# Altium PCB STM32_Dev_Board.PcbDoc (part 1 of 2)
Units mm, origin at the board's own origin, x right, y up, seen from the top; angles counter-clockwise.
Board outline 84.25 x 50.53 mm, 4 copper layers (Top Layer, Int1 (GND), Int2 (PWR), Bottom Layer), stack 1.57 mm thick; 70 components, 69 nets, 319 pads, 189 vias.
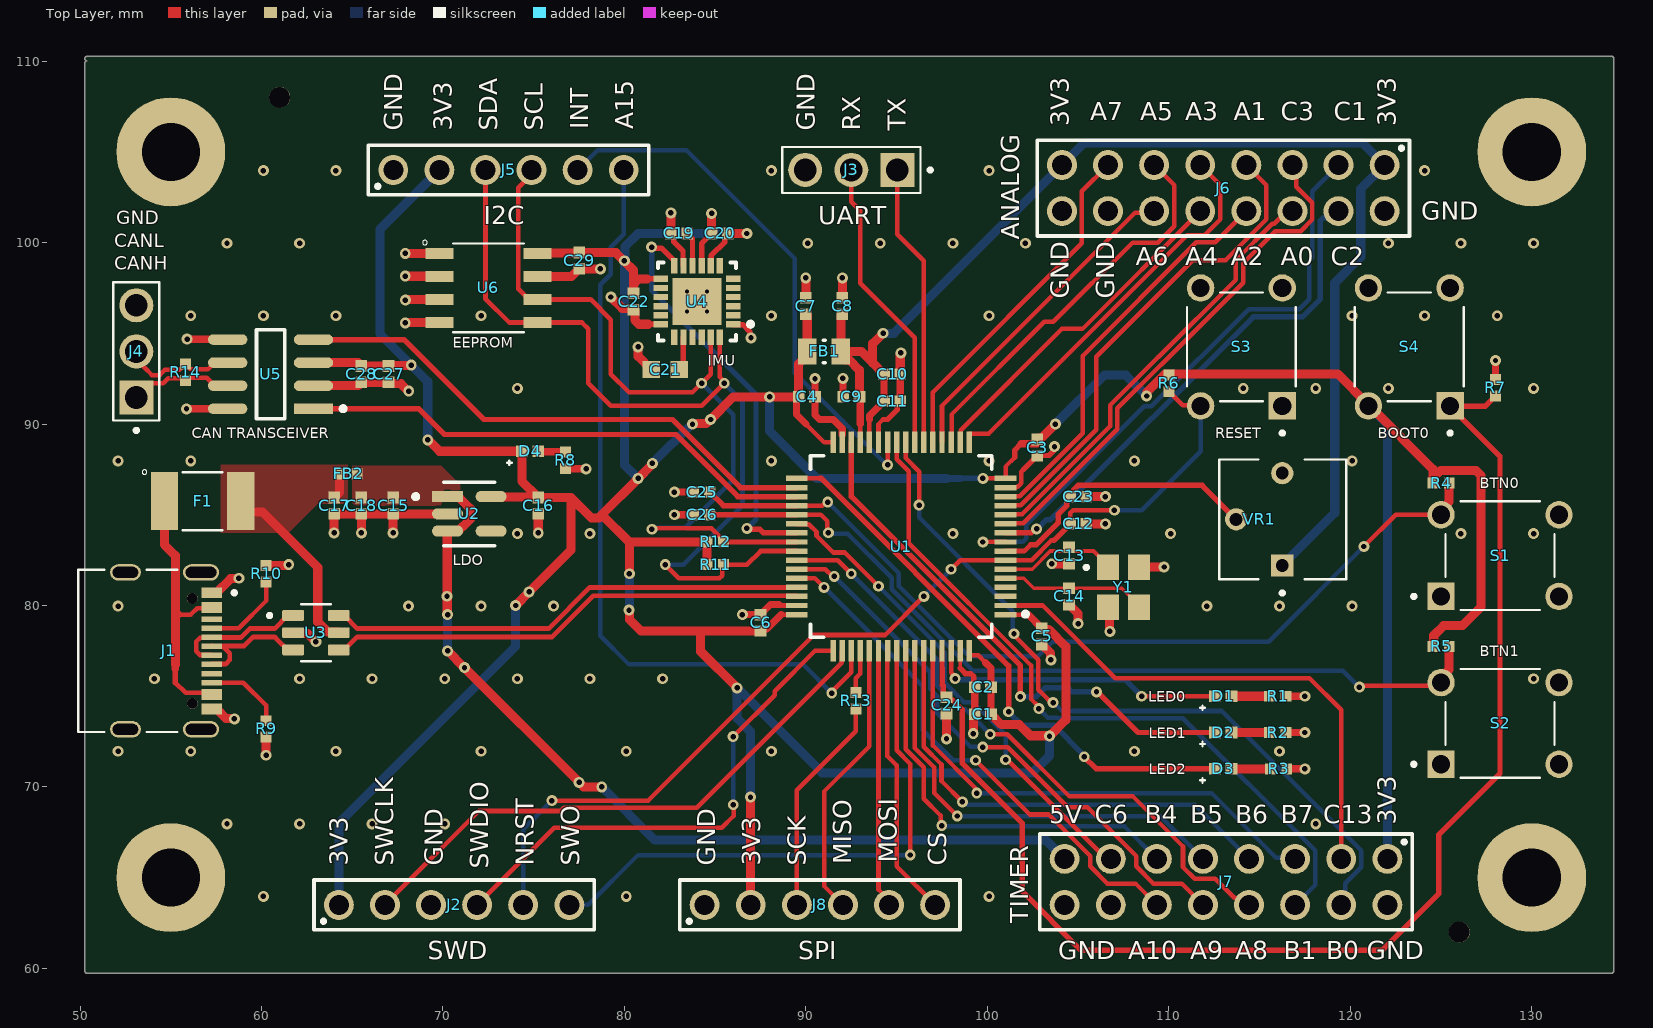
[diagram p0: Top Layer view]
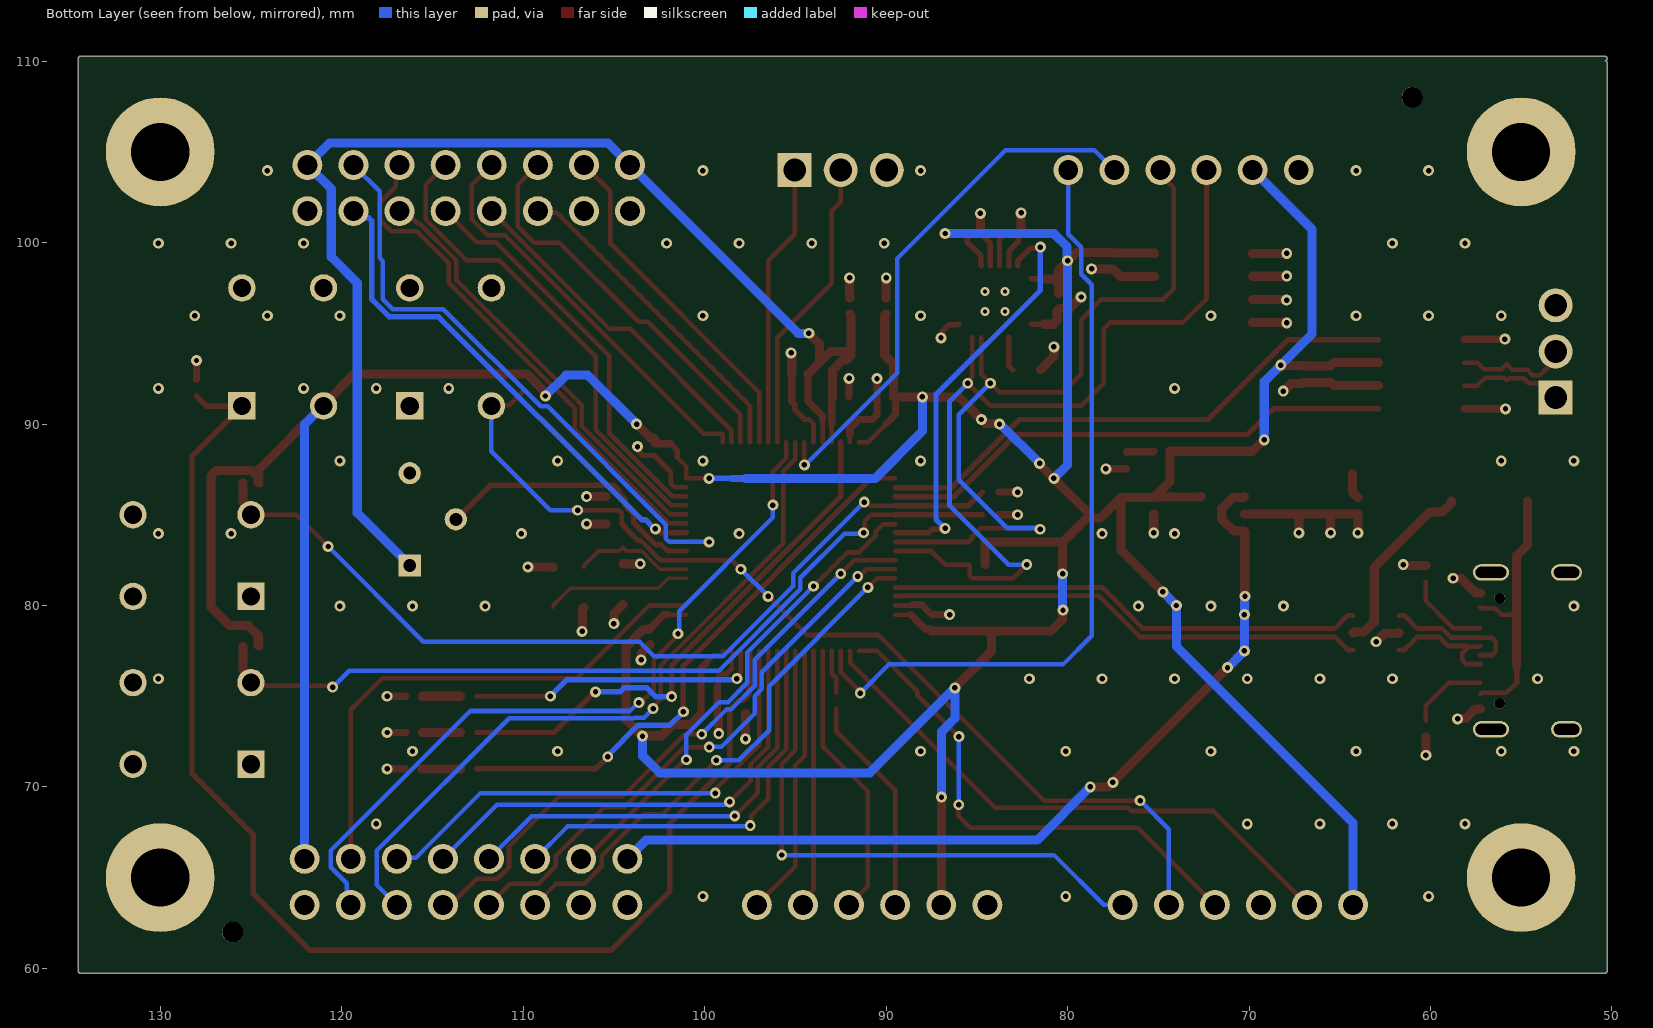
[diagram p1: Bottom Layer view, seen from below]
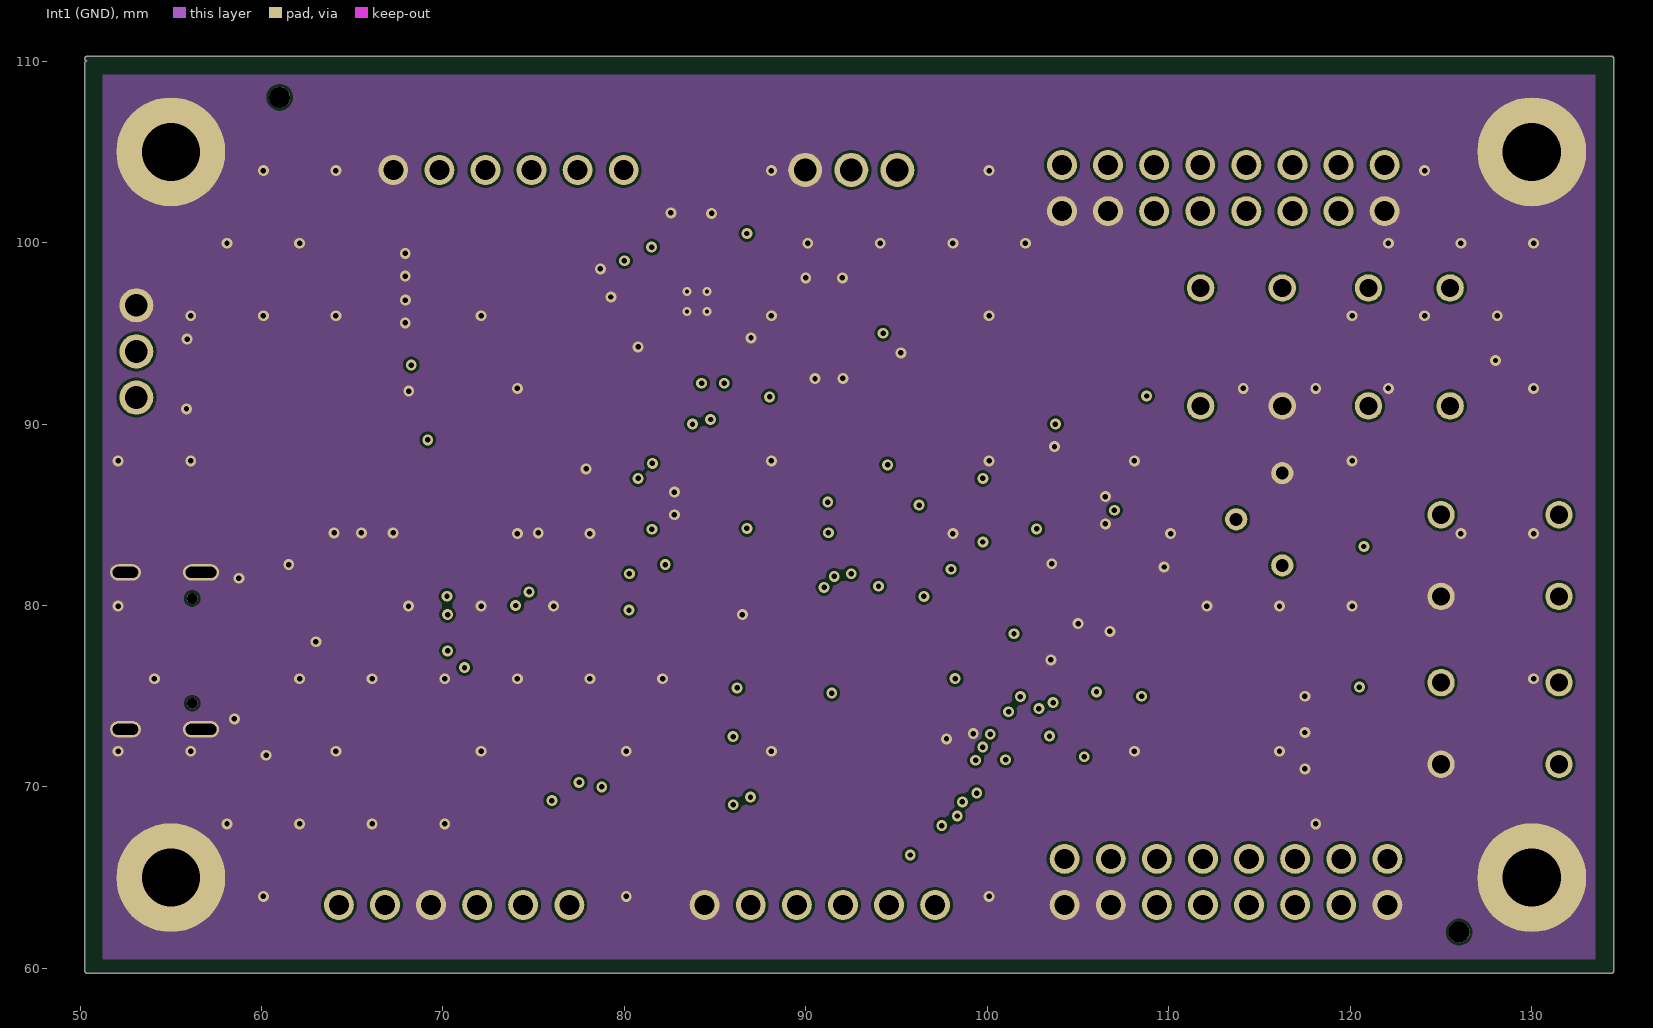
[diagram p2: Int1 (GND)]
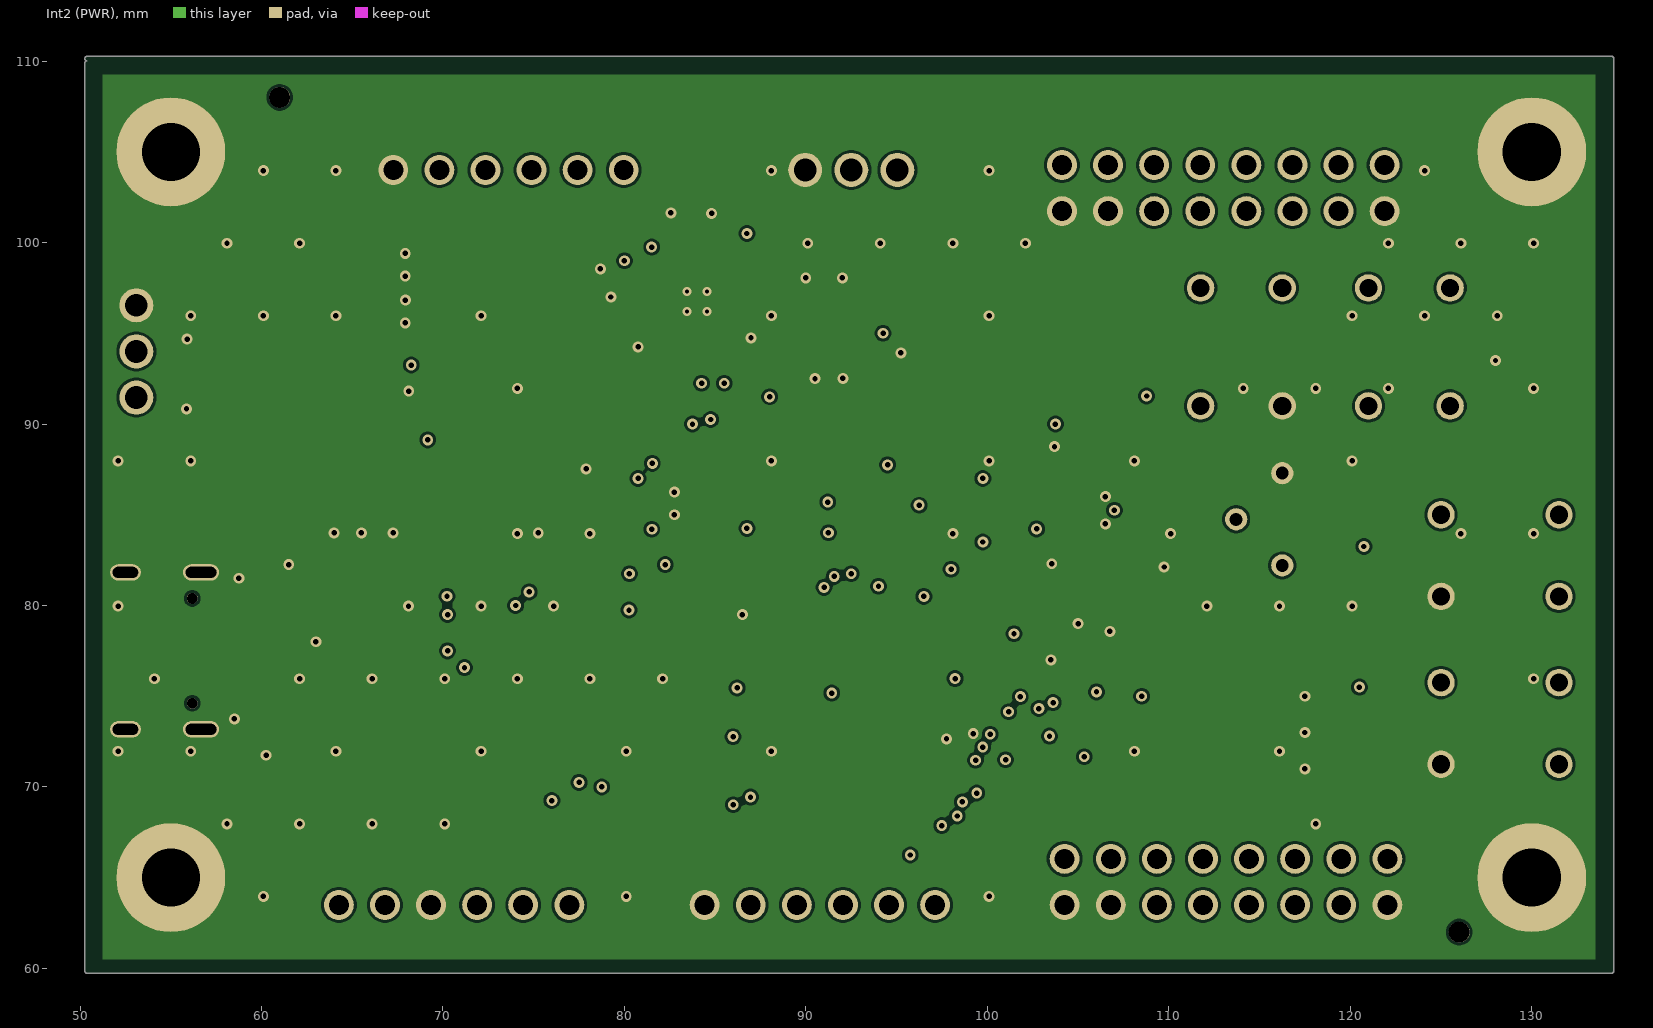
[diagram p3: Int2 (PWR)]
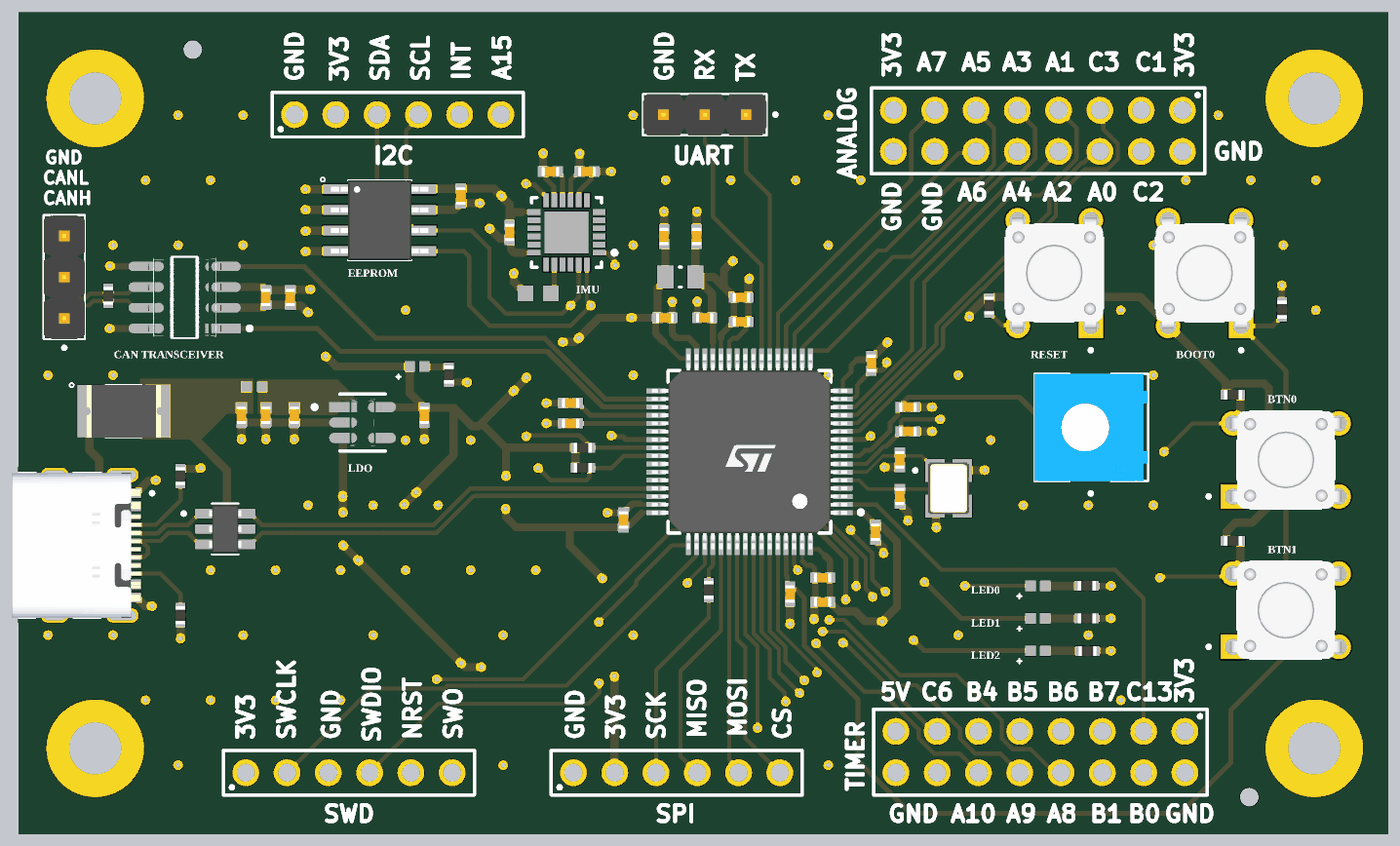
[diagram p4: 3D render of the assembled board from above, using the file's embedded part models]

## Layer stack, top to bottom
Top Solder: solder mask 0.0254, SM-001, Dk 4
Top Layer: signal copper 0.035
Dielectric 1: prepreg 0.2, PP-017, Dk 4.6
Int1 (GND): signal copper 0.0175
Dielectric 3: core 1.065, Core-039, Dk 4.6
Int2 (PWR): signal copper 0.0175
Dielectric 5: prepreg 0.2, PP-017, Dk 4.6
Bottom Layer: signal copper 0.035
Bottom Solder: solder mask 0.0254, SM-001, Dk 4

## Board outline
50.264,59.875 50.263,109.89 cw(c50.39,109.89) 50.365,110.015 cw(c50.39,110.14) 50.39,110.267 134.39,110.267 cw(c134.39,110.14) 134.517,110.14 134.517,59.86 cw(c134.39,59.86) 134.39,59.733 50.39,59.733 cw(c50.39,59.86)

## Design rules (kind name [scope] priority, off if disabled: settings)
BoardOutlineClearance [All] p1: gap=0.3 ignorepadtopadclearanceinfootprint=FALSE
Clearance [All] p1: gap=0.15 ignorepadtopadclearanceinfootprint=TRUE except(0.25: Fill-Fill Fill-Poly Fill-Region Poly-Poly Poly-Region Region-Region)
DiffPairsRouting USB_Routing [InDifferentialPairClass('DIFF_USB')] p1: maxlimit=0.254 minlimit=0.203 mostfreqgap=0.254 toplayer_maxgap=0.203 toplayer_prefgap=0.203 toplayer_minwidth=0.26 toplayer_maxwidth=0.26 toplayer_prefwidth=0.26 bottomlayer_maxgap=0.203 bottomlayer_prefgap=0.203 bottomlayer_minwidth=0.26 bottomlayer_maxwidth=0.26 bottomlayer_prefwidth=0.26 impedanceprofiledriven=TRUE impedanceprofileid={E58EA8D8-6F75-4459-A363-542458026450} impedanceprofilevalue=90.000000 maxuncoupledlength=4
DiffPairsRouting [InDifferentialPair('CAN')] p2: maxlimit=0.2 minlimit=0.2 mostfreqgap=0.2 toplayer_minwidth=0.25 toplayer_maxwidth=0.25 toplayer_prefwidth=0.25 midlayer1_minwidth=0.25 midlayer1_maxwidth=0.25 midlayer1_prefwidth=0.25 midlayer2_minwidth=0.25 midlayer2_maxwidth=0.25 midlayer2_prefwidth=0.25 bottomlayer_minwidth=0.25 bottomlayer_maxwidth=0.25 bottomlayer_prefwidth=0.25 maxuncoupledlength=4
HoleSize [All] p1: absolutevalues=TRUE maxlimit=6 minlimit=0.025 maxpercent=80.000 minpercent=20.000
MinimumAnnularRing [All] p1: minimumring=0.13
MinimumSolderMaskSliver qfn [HasFootprint('IS-QFN-24_V') vs HasFootprint('IS-QFN-24_V')] p1: minsoldermaskwidth=0
MinimumSolderMaskSliver [All] p2: minsoldermaskwidth=0.1
PolygonConnect [All] p1: connectstyle=Direct reliefconductorwidth=0.254 reliefentries=4 polygonreliefangle="90 Angle" airgapwidth=0.254
RoutingVias [All] p1: holewidth=0.3 width=0.6 viastyle="Through Hole" minholewidth=0.3 minwidth=0.6 maxholewidth=0.3 maxwidth=0.6
SilkToSilkClearance [All] p1: silktosilkclearance=0.15
SilkToSolderMaskClearance [IsPad] p1: minsilkscreentomaskgap=0.15 clearancetoexposedcopper=TRUE
SolderMaskExpansion [All] p1: expansion=0.038 istentingtop=FALSE
SupplyNets "Schematic Supply Nets_4" [InNet('+5V')] p1: voltage=0.000
SupplyNets "Schematic Supply Nets_3" [InNet('+3.3V')] p2: voltage=0.000
SupplyNets "Schematic Supply Nets_2" [InNet('GND')] p3: voltage=0.000
SupplyNets "Schematic Supply Nets_1" [InNet('+VBUS')] p4: voltage=0.000
SupplyNets "Schematic Supply Nets" [InNet('+3.3VA')] p5: voltage=0.000
UnRoutedNet [All] p1: checkbadconnections=TRUE
Width PWR [InNetClass('PWR')] p1: maxlimit=0.5 minlimit=0.4 preferedwidth=0.5
Width [All] p2: maxlimit=1 minlimit=0.2 preferedwidth=0.3 midlayer1_minwidth=0.254 midlayer1_maxwidth=0.254 midlayer1_prefwidth=0.254 midlayer2_minwidth=0.254 midlayer2_maxwidth=0.254 midlayer2_prefwidth=0.254 minimp=50.000000 maximp=50.000000 favimp=50.000000
24 further rules are at their usual default settings.

## Classes and differential pairs
differential pair class DIFF_USB: USB_CONN_D USB_D
differential pair CAN: +CAN_P -CAN_N
differential pair USB_D: +USB_D_P -USB_D_N
differential pair USB_CONN_D: +USB_CONN_D_P -USB_CONN_D_N

## Components (designator, comment, footprint, x,y, rotation, side; value= is the part's Value field where it differs from the comment)
C1 "CL05A475MP5NRNC" CAP-0402 99.75,74 r0 top
C2 "CL05B104KO5NNNC" CAP-0402 99.75,75.5 r0 top
C3 "CL05B104KO5NNNC" CAP-0402 102.75,88.7 r90 top
C4 "CL05B104KO5NNNC" CAP-0402 90.05,91.5 r180 top
C5 "CL05B104KO5NNNC" CAP-0402 103,78.3 r90 top
C6 "CL05B104KO5NNNC" CAP-0402 87.5,79.05 r270 top
C7 "CL05A105KA5NQNC" CAP-0402 90,96.5 r270 top
C8 "CL05A105KA5NQNC" CAP-0402 92,96.5 r270 top
C9 "CL05B103KB5NNNC" CAP-0402 92.5,91.5 r0 top
C10 "CL05A105KA5NQNC" CAP-0402 94.75,92.75 r180 top
C11 "CL05B104KO5NNNC" CAP-0402 94.75,91.25 r180 top
C12 "CL05B104KO5NNNC" CAP-0402 105,84.5 r180 top
C13 "CL05C100JB5NNNC" CAP-0402 104.5,82.75 r90 top
C14 "CL05C100JB5NNNC" CAP-0402 104.5,80.5 r90 top
C15 "CL05A105KA5NQNC" CAP-0402 67.25,85.5 r90 top
C16 "CL05A105KA5NQNC" CAP-0402 75.25,85.5 r90 top
C17 "CL05B104KO5NNNC" CAP-0402 64,85.5 r90 top
C18 "CL05B104KO5NNNC" CAP-0402 65.5,85.5 r90 top
C19 "CL05B104KO5NNNC" CAP-0402 83,100.5 r0 top
C20 "CL05B103KB5NNNC" CAP-0402 85.25,100.5 r0 top
C21 "0603B222K500NT" CAP-0603 82.25,93 r0 top
C22 "CL05B104KO5NNNC" CAP-0402 80.5,96.75 r90 top
C23 "CL05B104KO5NNNC" CAP-0402 105,86 r180 top
C24 "CL05B104KO5NNNC" CAP-0402 97.75,74.5 r90 top
C25 "CL05B104KO5NNNC" CAP-0402 84.25,86.25 r0 top
C26 "CL05B104KO5NNNC" CAP-0402 84.25,85 r0 top
C27 "CL05A105KA5NQNC" CAP-0402 67,92.75 r90 top
C28 "CL05B104KO5NNNC" CAP-0402 65.5,92.75 r90 top
C29 "CL05B104KO5NNNC" CAP-0402 77.5,99 r90 top
D1 "RED" LED-0402 113,75 r180 top
D2 "RED" LED-0402 113,73 r180 top
D3 "RED" LED-0402 113,71 r180 top
D4 "GREEN" LED-0402 74.8,88.5 r180 top
F1 "MF-MSMF050-2" FUSM4632X85 56.75,85.75 r0 top
FB1 "GZ2012D601TF" FB-0805 91,94 r0 top
FB2 "BLM15PX471SN1D" FB-0402 64.775,87.25 r0 top
J1 "TYPE-C-31-M-12" HRO_TYPE-C-31-M-12 52.5,77.5 r270 top
J2 "61300611121" 61300611121 70.61,63.5 r0 top
J3 "61300311121" WURTH_61300311121 92.5,104 r180 top
J4 "61300311121" WURTH_61300311121 53.1,94 r90 top
J5 "61300611121" 61300611121 73.61,104 r0 top
J6 "61301621121" 61301621121 113,103 r180 top
J7 "61301621121" 61301621121 113.15,64.77 r180 top
J8 "61300611121" 61300611121 90.77,63.5 r0 top
R1 "0402WGF1001TCE" RES-0402 116,75 r180 top
R2 "0402WGF1001TCE" RES-0402 116,73 r180 top
R3 "0402WGF1001TCE" RES-0402 116.05,71 r180 top
R4 "0402WGF1002TCE" RES-0402 125,86.75 r180 top
R5 "0402WGF1002TCE" RES-0402 125,77.75 r180 top
R6 "0402WGF1002TCE" RES-0402 110,92.25 r90 top
R7 "0402WGF1002TCE" RES-0402 128,92 r270 top
R8 "0402WGF1001TCE" RES-0402 76.75,88 r90 top
R9 "0402WGF5101TCE" RES-0402 60.25,73.2 r90 top
R10 "0402WGF5101TCE" RES-0402 60.25,81.75 r270 top
R11 "0402WGF2201TCE" RES-0402 85,82.25 r180 top
R12 "0402WGF2201TCE" RES-0402 85,83.5 r180 top
R13 "0402WGF330JTCE" RES-0402 92.75,74.75 r270 top
R14 "0402WGF1200TCE" RES-0402 55.8,92.85 r270 top
S1 "TL1105AF160Q" TL1105AF160Q 128.25,82.75 r0 top
S2 "TL1105AF160Q" TL1105AF160Q 128.25,73.5 r0 top
S3 "TL1105AF160Q" TL1105AF160Q 114,94.25 r90 top
S4 "TL1105AF160Q" TL1105AF160Q 123.25,94.25 r90 top
U1 "STM32G474RBT3" FP-LQFP64-5W-MFG 95.25,83.25 r180 top locked
U2 "AP2112K-3.3TRG1" FP-SOT25-IPC_A 71.451,85.05 r0 top
U3 "USBLC6-2SC6" SOT95P280X145-6N 63,78.5 r0 top
U4 "MPU-6050" IS-QFN-24_V 84,96.75 r180 top
U5 "TCAN334GDR" FP-D0008A-IPC_B 60.5,92.75 r180 top
U6 "AT24C256C-SSHL-T" SOIC127P600X175-8N 72.5,97.5 r0 top
VR1 "3362P-1-103LF" TRIM_3362P-1-103LF 116.25,84.75 r90 top
Y1 "16MHz" OSC_X322516MLB4SI 107.5,81 r0 top

## Footprints (in the part's own frame and the unit in brackets; to place one, negate y for a bottom-side part, rotate by r counter-clockwise, add the part's x,y. Pads: shape width x height; smd on the part's side, far side on the other; paste and mask are expansions set on the pad)
61300611121 [mm]
  round 1.65 hole 1.1: 1(-6.35,0) 2(-3.81,0) 3(-1.27,0) 4(1.27,0) 5(3.81,0) 6(6.35,0)
  silkscreen extent -7.72,-1.37 7.72,1.37
61301621121 [mm]
  round 1.65 hole 1.1: 1(-8.89,-1.27) 2(-8.89,1.27) 3(-6.35,-1.27) 4(-6.35,1.27) 5(-3.81,-1.27) 6(-3.81,1.27) 7(-1.27,-1.27) 8(-1.27,1.27) 9(1.27,-1.27) 10(1.27,1.27) 11(3.81,-1.27) 12(3.81,1.27) 13(6.35,-1.27) 14(6.35,1.27) 15(8.89,-1.27) 16(8.89,1.27)
  silkscreen extent -10.26,-2.64 10.26,2.64
CAP-0402 [mm] "Chip Capacitor, 2-Leads, Body 1.00x0.50mm, IPC Medium Density"
  rect 0.64x0.64 smd: 1(-0.45,0) 2(0.45,0)
  body extent -0.55,-0.3 0.55,0.3, height 0.6
CAP-0603 [mm] "Chip Capacitor, 2-Leads, Body 1.60x0.80mm, IPC Medium Density"
  rect 0.95x0.95 smd: 1(-0.775,0) 2(0.775,0)
  body extent -0.85,-0.45 0.85,0.45, height 0.8
FB-0402 [mm] "Chip Inductor, 2-Leads, Body 1.00x0.50mm, IPC Medium Density"
  rect 0.61x0.64 smd: 1(-0.475,0) 2(0.475,0)
  body extent -0.55,-0.3 0.55,0.3, height 0.6
FB-0805 [mm] "Chip Inductor, 2-Leads, Body 2.00x1.25mm, IPC Medium Density"
  rect 1.01x1.43 smd: 1(-0.925,0) 2(0.925,0)
  silkscreen extent -0.05,-0.62 0.05,0.62, body extent -1.05,-0.7 1.05,0.7, height 1
FP-D0008A-IPC_B [mm]
  rect 2.169x0.582 smd paste+0 mask+0: 1(-2.364,1.905)
  rrect100% 2.169x0.582 smd paste+0 mask+0: 2(-2.364,0.635) 3(-2.364,-0.635) 4(-2.364,-1.905) 5(2.364,-1.905) 6(2.364,-0.635) 7(2.364,0.635) 8(2.364,1.905)
  silkscreen extent -4.12,-2.45 0.78,2.45, body extent -3.7,-2.7 3.7,2.7, height 0.25
FP-LQFP64-5W-MFG [mm]
  rect 1.2x0.3 smd paste+0 mask+0: 1(-5.75,3.75) 2(-5.75,3.25) 3(-5.75,2.75) 4(-5.75,2.25) 5(-5.75,1.75) 6(-5.75,1.25) 7(-5.75,0.75) 8(-5.75,0.25) 9(-5.75,-0.25) 10(-5.75,-0.75) 11(-5.75,-1.25) 12(-5.75,-1.75) 13(-5.75,-2.25) 14(-5.75,-2.75) 15(-5.75,-3.25) 16(-5.75,-3.75) 33(5.75,-3.75) 34(5.75,-3.25) 35(5.75,-2.75) 36(5.75,-2.25) 37(5.75,-1.75) 38(5.75,-1.25) 39(5.75,-0.75) 40(5.75,-0.25) 41(5.75,0.25) 42(5.75,0.75) 43(5.75,1.25) 44(5.75,1.75) 45(5.75,2.25) 46(5.75,2.75) 47(5.75,3.25) 48(5.75,3.75)
  rect 0.3x1.2 smd paste+0 mask+0: 17(-3.75,-5.75) 18(-3.25,-5.75) 19(-2.75,-5.75) 20(-2.25,-5.75) 21(-1.75,-5.75) 22(-1.25,-5.75) 23(-0.75,-5.75) 24(-0.25,-5.75) 25(0.25,-5.75) 26(0.75,-5.75) 27(1.25,-5.75) 28(1.75,-5.75) 29(2.25,-5.75) 30(2.75,-5.75) 31(3.25,-5.75) 32(3.75,-5.75) 49(3.75,5.75) 50(3.25,5.75) 51(2.75,5.75) 52(2.25,5.75) 53(1.75,5.75) 54(1.25,5.75) 55(0.75,5.75) 56(0.25,5.75) 57(-0.25,5.75) 58(-0.75,5.75) 59(-1.25,5.75) 60(-1.75,5.75) 61(-2.25,5.75) 62(-2.75,5.75) 63(-3.25,5.75) 64(-3.75,5.75)
  silkscreen extent -6.98,-5 5,5, body extent -6.45,-6.45 6.45,6.45, height 0.25
FP-SOT25-IPC_A [mm]
  rect 1.707x0.616 smd paste+0 mask+0: 1(-1.201,0.95)
  rrect100% 1.707x0.616 smd paste+0 mask+0: 2(-1.201,0) 3(-1.201,-0.95) 4(1.201,-0.95) 5(1.201,0.95)
  silkscreen extent -3.08,-1.75 1.4,1.75, body extent -2.55,-2 2.55,2, height 0.25
FUSM4632X85 [mm]
  rect 1.5x3.2 smd: 1(-2.1,0) 2(2.1,0)
  silkscreen extent -3.33,-1.6 1.1,1.73, body extent -2.27,-1.62 2.27,1.62, height 1.1
HRO_TYPE-C-31-M-12 [mm]
  rect 0.6x1.14 smd mask+0.05: A1_B12(-3.2,4.75) A4_B9(-2.4,4.75) B1_A12(3.2,4.75) B4_A9(2.4,4.75)
  rect 0.3x1.14 smd mask+0.05: A5(-1.25,4.75) A6(-0.25,4.75) A7(0.25,4.75) A8(1.25,4.75) B5(1.75,4.75) B6(0.75,4.75) B7(-0.75,4.75) B8(-1.75,4.75)
  oval 0.9x2 hole 0.6 slot 1.7 at 90 deg: S1(-4.325,4.17) S2(4.325,4.17)
  oval 0.9x1.7 hole 0.6 slot 1.4 at 90 deg: S3(-4.325,0) S4(4.325,0)
  round 0.6 hole 0.6 unplated: ""(-2.89,3.68) ""(2.89,3.68)
  silkscreen extent -4.47,-2.6 4.47,6.1, body extent -4.47,-2.6 4.47,5.31, height 3.31
IS-QFN-24_V [mm] "QFN, 24-Leads, Body 4x4mm, Pitch 0.5mm, Thermal Pad 2.7x2.6mm"
  rect 0.8x0.35 smd: 1(-2,1.25) 2(-2,0.75) 3(-2,0.25) 4(-2,-0.25) 5(-2,-0.75) 6(-2,-1.25) 13(2,-1.25) 14(2,-0.75) 15(2,-0.25) 16(2,0.25) 17(2,0.75) 18(2,1.25)
  rect 0.35x0.85 smd mask+0.102: 7(-1.25,-1.975) 8(-0.75,-1.975) 9(-0.25,-1.975) 10(0.25,-1.975) 11(0.75,-1.975) 12(1.25,-1.975) 19(1.25,1.975) 20(0.75,1.975) 21(0.25,1.975) 22(-0.25,1.975) 23(-0.75,1.975) 24(-1.25,1.975)
  rect 2.7x2.6 smd: 25(0,0)
  silkscreen extent -3.08,-2.15 2.15,2.15, body extent -2,-2 2,2, height 0.95
LED-0402 [mm] "Chip Diode, 2-Leads, Body 1.00x0.50mm, IPC Medium Density"
  rect 0.65x0.65 smd: 1(-0.45,0) 2(0.45,0)
  silkscreen extent 1.02,0.51 1.27,0.76, body extent -0.55,-0.3 0.55,0.3, height 0.6
OSC_X322516MLB4SI [mm]
  rect 1.2x1.4 smd: 1(-0.85,1.1) 2(-0.85,-1.1) 3(0.85,-1.1) 4(0.85,1.1)
  silkscreen extent -2.15,1 -1.95,1.2, body extent -1.25,-1.6 1.25,1.6, height 0.8
RES-0402 [mm] "Chip Resistor, 2-Leads, Body 1.00x0.50mm, IPC Medium Density"
  rect 0.6x0.6 smd: 1(-0.45,0) 2(0.45,0)
  body extent -0.55,-0.3 0.55,0.3, height 0.6
SOIC127P600X175-8N [mm]
  rect 1.55x0.6 smd paste+0 mask+0.102: 1(-2.7,1.905) 2(-2.7,0.635) 3(-2.7,-0.635) 4(-2.7,-1.905) 5(2.7,-1.905) 6(2.7,-0.635) 7(2.7,0.635) 8(2.7,1.905)
  silkscreen extent -3.63,-2.45 1.95,2.63, body extent -3,-2.45 3,2.45, height 1.75
SOT95P280X145-6N [mm]
  rrect25% 1.21x0.59 smd: 1(-1.255,0.95) 2(-1.255,0) 3(-1.255,-0.95) 4(1.255,-0.95) 5(1.255,0) 6(1.255,0.95)
  silkscreen extent -2.65,-1.57 0.81,1.57, body extent -1.4,-1.46 1.4,1.46, height 0.4
TL1105AF160Q [mm]
  rect 1.508x1.508 / inner round 1.508 / far side rect 1.508x1.508 hole 1 mask+0.102: 1(-3.25,-2.25)
  round 1.508 hole 1 mask+0.102: 2(3.25,-2.25) 3(-3.25,2.25) 4(3.25,2.25)
  silkscreen extent -4.85,-3 3,3, body extent -3.94,-3 3.94,3, height 5.12
TRIM_3362P-1-103LF [mm]
  rect 1.222x1.222 / inner round 1.222 / far side rect 1.222x1.222 hole 0.714: 1(-2.54,0)
  round 1.222 hole 0.714: 2(0,2.54) 3(2.54,0)
  silkscreen extent -4.16,-3.53 3.3,3.47, body extent -3.3,-3.49 3.3,3.49, height 4.88
WURTH_61300311121 [mm]
  rect 1.875x1.875 / inner round 1.875 / far side rect 1.875x1.875 hole 1.25: 1(-2.54,0)
  round 1.875 hole 1.25: 2(0,0) 3(2.54,0)
  silkscreen extent -4.45,-1.27 3.81,1.27, body extent -3.81,-1.27 3.81,1.27, height 7.27

## Part data
C1: "Capacitor, Ceramic (MLCC), 4.7uF, ±20%, 10V, X5R, ±20%, SMD 0402", Capacitance=4.7uF, Capacitance @ 1.2V DC Bias=3.816uF, Capacitance @ 1.5V DC Bias=3.450uF, Capacitance @ 1.8V DC Bias=3.100uF, Capacitance @ 1.35V DC Bias=3.633uF, Capacitance @ 1V DC Bias=4.048uF, Capacitance @ 2.5V DC Bias=2.453uF, Capacitance @ 3.3V DC Bias=1.872uF, Capacitance @ 3.7V DC Bias=1.663uF, Capacitance @ 4.2V DC Bias=1.455uF, Capacitance @ 5V DC Bias=1.191uF, Capacitance @ 9V DC Bias=0.548uF, JLCPCB Basic Part=Yes, JLCPCB Part Number=C23733, Manufacturer="Samsung Electro-Mechanics", Package Size=0402, Temperature Coefficient=X5R, Temperature Rating="-55°C ~ 85°C", Tolerance=±20%, Voltage Rating=10V, Category="Capacitors - MLCC", ComponentLink1Description=Datasheet, ComponentLink1URL=https://wmsc.lcsc.com/wmsc/upload/file/pdf/v2/lcsc/2304140030_Samsung-Electro-Mechanics-CL05A475MP5NRNC_C23733.pdf, ComponentLink2Description="JLCPCB Part URL", ComponentLink2URL=https://jlcpcb.com/partdetail/C23733, ComponentLink3Description="LCSC Part URL", ComponentLink3URL=https://lcsc.com/product-detail/Multilayer-Ceramic-Capacitors-MLCC---SMD-SMT_Samsung-Electro-Mechanics-Samsung-Electro-Mechanics-CL05A475MP5NRNC_C23733.html, ComponentLink4Description="Samsung Component Library", ComponentLink4URL=https://weblib.samsungsem.com/mlcc/mlcc-ec.do?partNumber=CL05A475MP5NRN, Impedance (0V Bias) @ 1GHz=0.66Ω, Impedance (0V Bias) @ 1kHz=45.6Ω, Impedance (0V Bias) @ 1MHz=0.0479Ω, Impedance (0V Bias) @ 2GHz=1.52Ω, Impedance (0V Bias) @ 5GHz=3.05Ω, Impedance (0V Bias) @ 5kHz=9.34Ω, Impedance (0V Bias) @ 5MHz=0.00709Ω, Impedance (0V Bias) @ 10kHz=4.72Ω, Impedance (0V Bias) @ 10MHz=0.0183Ω, Impedance (0V Bias) @ 50kHz=0.964Ω, Impedance (0V Bias) @ 50MHz=0.06Ω, Impedance (0V Bias) @ 100Hz=442Ω, Impedance (0V Bias) @ 100kHz=0.486Ω, Impedance (0V Bias) @ 100MHz=0.102Ω, Impedance (0V Bias) @ 500Hz=90.2Ω, Impedance (0V Bias) @ 500kHz=0.0987Ω, Impedance (0V Bias) @ 500MHz=0.377Ω, Impedance (10V Bias) @ 1GHz=0.673Ω, Impedance (10V Bias) @ 1kHz=338Ω, Impedance (10V Bias) @ 1MHz=0.344Ω, Impedance (10V Bias) @ 2GHz=1.52Ω, Impedance (10V Bias) @ 5GHz=3.06Ω, Impedance (10V Bias) @ 5kHz=68.2Ω, Impedance (10V Bias) @ 5MHz=0.0603Ω, Impedance (10V Bias) @ 10kHz=34.2Ω, Impedance (10V Bias) @ 10MHz=0.0164Ω, Impedance (10V Bias) @ 50kHz=6.88Ω, Impedance (10V Bias) @ 50MHz=0.064Ω, Impedance (10V Bias) @ 100Hz=3.34E+03Ω, Impedance (10V Bias) @ 100kHz=3.45Ω, Impedance (10V Bias) @ 100MHz=0.105Ω, Impedance (10V Bias) @ 500Hz=674Ω, Impedance (10V Bias) @ 500kHz=0.693Ω, Impedance (10V Bias) @ 500MHz=0.385Ω, Manufacturer Part Number=CL05A475MP5NRNC, RoHS=Yes, Supplier 1=LCSC, Supplier Part Number 1=C23733
C2 C3 C4 C5 C6 C11 C12 C17 C18 C19 C22 C23 C24 C25 C26 C28 C29: "Capacitor, Ceramic (MLCC), 100nF, ±10%, 16V, X7R, ±10%, SMD 0402", Capacitance=100nF, Capacitance @ 1.2V DC Bias=104.598nF, Capacitance @ 1.5V DC Bias=104.372nF, Capacitance @ 1.8V DC Bias=104.042nF, Capacitance @ 1.35V DC Bias=104.495nF, Capacitance @ 1V DC Bias=104.721nF, Capacitance @ 2.5V DC Bias=102.634nF, Capacitance @ 3.3V DC Bias=100.452nF, Capacitance @ 3.7V DC Bias=99.160nF, Capacitance @ 4.2V DC Bias=97.441nF, Capacitance @ 5V DC Bias=94.577nF, Capacitance @ 9V DC Bias=78.638nF, Capacitance @ 12V DC Bias=66.291nF, Capacitance @ 15V DC Bias=54.779nF, JLCPCB Basic Part=Yes, JLCPCB Part Number=C1525, Manufacturer="Samsung Electro-Mechanics", Package Size=0402, Temperature Coefficient=X7R, Temperature Rating="-55°C ~ 125°C", Tolerance=±10%, Voltage Rating=16V, Category="Capacitors - MLCC", ComponentLink1Description=Datasheet, ComponentLink1URL=https://wmsc.lcsc.com/wmsc/upload/file/pdf/v2/lcsc/2304140030_Samsung-Electro-Mechanics-CL05B104KO5NNNC_C1525.pdf, ComponentLink2Description="JLCPCB Part URL", ComponentLink2URL=https://jlcpcb.com/partdetail/C1525, ComponentLink3Description="LCSC Part URL", ComponentLink3URL=https://lcsc.com/product-detail/Multilayer-Ceramic-Capacitors-MLCC---SMD-SMT_Samsung-Electro-Mechanics-Samsung-Electro-Mechanics-CL05B104KO5NNNC_C1525.html, ComponentLink4Description="Samsung Component Library", ComponentLink4URL=https://weblib.samsungsem.com/mlcc/mlcc-ec.do?partNumber=CL05B104KO5NNN, Impedance (0V Bias) @ 1GHz=0.97Ω, Impedance (0V Bias) @ 1kHz=1.75E+03Ω, Impedance (0V Bias) @ 1MHz=1.87Ω, Impedance (0V Bias) @ 2GHz=2.26Ω, Impedance (0V Bias) @ 5GHz=4.75Ω, Impedance (0V Bias) @ 5kHz=356Ω, Impedance (0V Bias) @ 5MHz=0.373Ω, Impedance (0V Bias) @ 10kHz=179Ω, Impedance (0V Bias) @ 10MHz=0.175Ω, Impedance (0V Bias) @ 50kHz=36.4Ω, Impedance (0V Bias) @ 50MHz=0.064Ω, Impedance (0V Bias) @ 100Hz=1.71E+04Ω, Impedance (0V Bias) @ 100kHz=18.3Ω, Impedance (0V Bias) @ 100MHz=0.122Ω, Impedance (0V Bias) @ 500Hz=3.48E+03Ω, Impedance (0V Bias) @ 500kHz=3.72Ω, Impedance (0V Bias) @ 500MHz=0.525Ω, Impedance (16V Bias) @ 1GHz=0.969Ω, Impedance (16V Bias) @ 1kHz=2.61E+03Ω, Impedance (16V Bias) @ 1MHz=2.76Ω, Impedance (16V Bias) @ 2GHz=2.25Ω, Impedance (16V Bias) @ 5GHz=4.7Ω, Impedance (16V Bias) @ 5kHz=529Ω, Impedance (16V Bias) @ 5MHz=0.587Ω, Impedance (16V Bias) @ 10kHz=266Ω, Impedance (16V Bias) @ 10MHz=0.277Ω, Impedance (16V Bias) @ 50kHz=54Ω, Impedance (16V Bias) @ 50MHz=0.0412Ω, Impedance (16V Bias) @ 100Hz=2.55E+04Ω, Impedance (16V Bias) @ 100kHz=27.2Ω, Impedance (16V Bias) @ 100MHz=0.133Ω, Impedance (16V Bias) @ 500Hz=5.18E+03Ω, Impedance (16V Bias) @ 500kHz=5.5Ω, Impedance (16V Bias) @ 500MHz=0.524Ω, Manufacturer Part Number=CL05B104KO5NNNC, RoHS=Yes, Supplier 1=LCSC, Supplier Part Number 1=C1525
C7 C8 C10 C15 C16 C27: "Capacitor, Ceramic (MLCC), 1uF, ±10%, 25V, X5R, ±10%, SMD 0402", Capacitance=1uF, Capacitance @ 1.2V DC Bias=0.983uF, Capacitance @ 1.5V DC Bias=0.932uF, Capacitance @ 1.8V DC Bias=0.879uF, Capacitance @ 1.35V DC Bias=0.958uF, Capacitance @ 1V DC Bias=1.014uF, Capacitance @ 2.5V DC Bias=0.755uF, Capacitance @ 3.3V DC Bias=0.618uF, Capacitance @ 3.7V DC Bias=0.562uF, Capacitance @ 4.2V DC Bias=0.501uF, Capacitance @ 5V DC Bias=0.420uF, Capacitance @ 9V DC Bias=0.204uF, Capacitance @ 12V DC Bias=0.147uF, Capacitance @ 15V DC Bias=0.107uF, Capacitance @ 24V DC Bias=0.061uF, JLCPCB Basic Part=Yes, JLCPCB Part Number=C52923, Manufacturer="Samsung Electro-Mechanics", Package Size=0402, Temperature Coefficient=X5R, Temperature Rating="-55°C ~ 85°C", Tolerance=±10%, Voltage Rating=25V, Category="Capacitors - MLCC", ComponentLink1Description=Datasheet, ComponentLink1URL=https://wmsc.lcsc.com/wmsc/upload/file/pdf/v2/lcsc/2304140030_Samsung-Electro-Mechanics-CL05A105KA5NQNC_C52923.pdf, ComponentLink2Description="JLCPCB Part URL", ComponentLink2URL=https://jlcpcb.com/partdetail/C52923, ComponentLink3Description="LCSC Part URL", ComponentLink3URL=https://lcsc.com/product-detail/Multilayer-Ceramic-Capacitors-MLCC---SMD-SMT_Samsung-Electro-Mechanics-Samsung-Electro-Mechanics-CL05A105KA5NQNC_C52923.html, ComponentLink4Description="Samsung Component Library", ComponentLink4URL=https://weblib.samsungsem.com/mlcc/mlcc-ec.do?partNumber=CL05A105KA5NQN, Impedance (0V Bias) @ 1GHz=0.812Ω, Impedance (0V Bias) @ 1kHz=204Ω, Impedance (0V Bias) @ 1MHz=0.234Ω, Impedance (0V Bias) @ 2GHz=1.8Ω, Impedance (0V Bias) @ 5GHz=3.57Ω, Impedance (0V Bias) @ 5kHz=42Ω, Impedance (0V Bias) @ 5MHz=0.0392Ω, Impedance (0V Bias) @ 10kHz=21.3Ω, Impedance (0V Bias) @ 10MHz=0.0118Ω, Impedance (0V Bias) @ 50kHz=4.4Ω, Impedance (0V Bias) @ 50MHz=0.0671Ω, Impedance (0V Bias) @ 100Hz=1.95E+03Ω, Impedance (0V Bias) @ 100kHz=2.23Ω, Impedance (0V Bias) @ 100MHz=0.118Ω, Impedance (0V Bias) @ 500Hz=402Ω, Impedance (0V Bias) @ 500kHz=0.462Ω, Impedance (0V Bias) @ 500MHz=0.452Ω, Impedance (25V Bias) @ 1GHz=0.82Ω, Impedance (25V Bias) @ 1kHz=2.65E+03Ω, Impedance (25V Bias) @ 1MHz=2.7Ω, Impedance (25V Bias) @ 2GHz=1.85Ω, Impedance (25V Bias) @ 5GHz=3.51Ω, Impedance (25V Bias) @ 5kHz=533Ω, Impedance (25V Bias) @ 5MHz=0.621Ω, Impedance (25V Bias) @ 10kHz=267Ω, Impedance (25V Bias) @ 10MHz=0.298Ω, Impedance (25V Bias) @ 50kHz=53.8Ω, Impedance (25V Bias) @ 50MHz=0.0523Ω, Impedance (25V Bias) @ 100Hz=2.62E+04Ω, Impedance (25V Bias) @ 100kHz=27Ω, Impedance (25V Bias) @ 100MHz=0.113Ω, Impedance (25V Bias) @ 500Hz=5.28E+03Ω, Impedance (25V Bias) @ 500kHz=5.42Ω, Impedance (25V Bias) @ 500MHz=0.451Ω, Manufacturer Part Number=CL05A105KA5NQNC, RoHS=Yes, Supplier 1=LCSC, Supplier Part Number 1=C52923
C9 C20: "Capacitor, Ceramic (MLCC), 10nF, ±10%, 50V, X7R, ±10%, SMD 0402", Capacitance=10nF, Capacitance @ 1.2V DC Bias=10.434nF, Capacitance @ 1.5V DC Bias=10.455nF, Capacitance @ 1.8V DC Bias=10.480nF, Capacitance @ 1.35V DC Bias=10.444nF, Capacitance @ 1V DC Bias=10.426nF, Capacitance @ 2.5V DC Bias=10.514nF, Capacitance @ 3.3V DC Bias=10.519nF, Capacitance @ 3.7V DC Bias=10.504nF, Capacitance @ 4.2V DC Bias=10.473nF, Capacitance @ 5V DC Bias=10.402nF, Capacitance @ 9V DC Bias=10.052nF, Capacitance @ 12V DC Bias=9.639nF, Capacitance @ 15V DC Bias=9.187nF, Capacitance @ 24V DC Bias=7.606nF, Capacitance @ 36V DC Bias=5.499nF, Capacitance @ 48V DC Bias=3.591nF, JLCPCB Basic Part=Yes, JLCPCB Part Number=C15195, Manufacturer="Samsung Electro-Mechanics", Package Size=0402, Temperature Coefficient=X7R, Temperature Rating="-55°C ~ 125°C", Tolerance=±10%, Voltage Rating=50V, Category="Capacitors - MLCC", ComponentLink1Description=Datasheet, ComponentLink1URL=https://wmsc.lcsc.com/wmsc/upload/file/pdf/v2/lcsc/2304140030_Samsung-Electro-Mechanics-CL05B103KB5NNNC_C15195.pdf, ComponentLink2Description="JLCPCB Part URL", ComponentLink2URL=https://jlcpcb.com/partdetail/C15195, ComponentLink3Description="LCSC Part URL", ComponentLink3URL=https://lcsc.com/product-detail/Multilayer-Ceramic-Capacitors-MLCC---SMD-SMT_Samsung-Electro-Mechanics-Samsung-Electro-Mechanics-CL05B103KB5NNNC_C15195.html, ComponentLink4Description="Samsung Component Library", ComponentLink4URL=https://weblib.samsungsem.com/mlcc/mlcc-ec.do?partNumber=CL05B103KB5NNN, Impedance (0V Bias) @ 1GHz=1.42Ω, Impedance (0V Bias) @ 1kHz=1.61E+04Ω, Impedance (0V Bias) @ 1MHz=17.3Ω, Impedance (0V Bias) @ 2GHz=3.22Ω, Impedance (0V Bias) @ 5GHz=6.48Ω, Impedance (0V Bias) @ 5kHz=3.27E+03Ω, Impedance (0V Bias) @ 5MHz=3.52Ω, Impedance (0V Bias) @ 10kHz=1.65E+03Ω, Impedance (0V Bias) @ 10MHz=1.77Ω, Impedance (0V Bias) @ 50kHz=335Ω, Impedance (0V Bias) @ 50MHz=0.285Ω, Impedance (0V Bias) @ 100Hz=1.57E+05Ω, Impedance (0V Bias) @ 100kHz=169Ω, Impedance (0V Bias) @ 100MHz=0.0835Ω, Impedance (0V Bias) @ 500Hz=3.19E+04Ω, Impedance (0V Bias) @ 500kHz=34.3Ω, Impedance (0V Bias) @ 500MHz=0.751Ω, Manufacturer Part Number=CL05B103KB5NNNC, RoHS=Yes, Supplier 1=LCSC, Supplier Part Number 1=C15195
C13 C14: "Capacitor, Ceramic (MLCC), 10pF, ±5%, 50V, C0G, ±5%, SMD 0402", Capacitance=10pF, JLCPCB Basic Part=Yes, JLCPCB Part Number=C32949, Manufacturer="Samsung Electro-Mechanics", Package Size=0402, Temperature Coefficient=C0G, Temperature Rating="-55°C ~ 125°C", Tolerance=±5%, Voltage Rating=50V, Category="Capacitors - MLCC", ComponentLink1Description=Datasheet, ComponentLink1URL=https://wmsc.lcsc.com/wmsc/upload/file/pdf/v2/lcsc/2304140030_Samsung-Electro-Mechanics-CL05C100JB5NNNC_C32949.pdf, ComponentLink2Description="JLCPCB Part URL", ComponentLink2URL=https://jlcpcb.com/partdetail/C32949, ComponentLink3Description="LCSC Part URL", ComponentLink3URL=https://lcsc.com/product-detail/Multilayer-Ceramic-Capacitors-MLCC---SMD-SMT_Samsung-Electro-Mechanics-Samsung-Electro-Mechanics-CL05C100JB5NNNC_C32949.html, ComponentLink4Description="Samsung Component Library", ComponentLink4URL=https://weblib.samsungsem.com/mlcc/mlcc-ec.do?partNumber=CL05C100JB5NNN, Impedance (0V Bias) @ 1GHz=14.2Ω, Impedance (0V Bias) @ 2GHz=2.29Ω, Impedance (0V Bias) @ 5GHz=4.97Ω, Impedance (0V Bias) @ 100MHz=159Ω, Impedance (0V Bias) @ 500MHz=31Ω, Manufacturer Part Number=CL05C100JB5NNNC, RoHS=Yes, Supplier 1=LCSC, Supplier Part Number 1=C32949
C21: "Capacitor, Ceramic (MLCC), 2.2nF, ±10%, 50V, X7R, ±10%, SMD 0603", Capacitance=2.2nF, JLCPCB Basic Part=Yes, JLCPCB Part Number=C1604, Manufacturer="FH(Guangdong Fenghua Advanced Tech)", Package Size=0603, Temperature Coefficient=X7R, Tolerance=±10%, Voltage Rating=50V, Category="Capacitors - MLCC", ComponentLink1Description=Datasheet, ComponentLink1URL=https://wmsc.lcsc.com/wmsc/upload/file/pdf/v2/lcsc/2304140030_FH--Guangdong-Fenghua-Advanced-Tech-0603B222K500NT_C1604.pdf, ComponentLink2Description="JLCPCB Part URL", ComponentLink2URL=https://jlcpcb.com/partdetail/C1604, ComponentLink3Description="LCSC Part URL", ComponentLink3URL=https://lcsc.com/product-detail/Multilayer-Ceramic-Capacitors-MLCC---SMD-SMT_FH-Guangdong-Fenghua-Advanced-Tech-FH-Guangdong-Fenghua-Advanced-Tech-0603B222K500NT_C1604.html, Manufacturer Part Number=0603B222K500NT, RoHS=Yes, Supplier 1=LCSC, Supplier Part Number 1=C1604
D1 D2 D3: library part 16-213SDRC/S530-A3/TR8, "-40℃~+85℃ 120° 20mA 2V 43mcd 639nm 650nm Red Water Clear 0402 LED Indication - Discrete ROHS", Package=0402, Availability=Unavailable, Check_prices=https://www.snapeda.com/parts/150040GS73220/W%25C3%25BCrth+Elektronik+Midcom/view-part/?ref=eda, MF="WÃ¼rth Elektronik", MP=150040GS73220, Price=None, SnapEDA_Link=https://www.snapeda.com/parts/150040GS73220/W%25C3%25BCrth+Elektronik+Midcom/view-part/?ref=snap
D4: library part 16-213/GHC-YR1S1/3T, "-40℃~+85℃ 1.7V~2.4V 120° 20mA 36mcd~50mcd 60mW 624nm 632nm Discrete Diode Red Water Clear 0402 LED Indication - Discrete ROHS", Package=0402, Availability=Unavailable, Check_prices=https://www.snapeda.com/parts/150040GS73220/W%25C3%25BCrth+Elektronik+Midcom/view-part/?ref=eda, MF="WÃ¼rth Elektronik", MP=150040GS73220, Price=None, SnapEDA_Link=https://www.snapeda.com/parts/150040GS73220/W%25C3%25BCrth+Elektronik+Midcom/view-part/?ref=snap
F1: "Polymeric PTC Resettable Fuse 15V 500 mA Ih Surface Mount 1812 (4532 Metric), Concave", Package="1812 Bourns", Availability="In Stock", Check_prices=https://www.snapeda.com/parts/MF-MSMF050-2/Bourns+-+J.W.+Miller/view-part/?ref=eda, MF=Bourns, MP=MF-MSMF050-2, Price=None, Purchase-URL=https://pricing.snapeda.com/search/part/MF-MSMF050-2/?ref=eda, SnapEDA_Link=https://www.snapeda.com/parts/MF-MSMF050-2/Bourns+-+J.W.+Miller/view-part/?ref=snap
FB1: "Ferrite, 600Ω@100MHz, ±25%, 300mΩ, 500mA, SMD 0805", DC Resistance=300mΩ, Impedance @ Frequency=600Ω@100MHz, JLCPCB Basic Part=Yes, JLCPCB Part Number=C1017, Manufacturer=Sunlord, Package Size=0805, Rated Current=500mA, Tolerance=±25%, Category="Ferrite Beads", ComponentLink1Description=Datasheet, ComponentLink1URL=https://wmsc.lcsc.com/wmsc/upload/file/pdf/v2/lcsc/2310301640_Sunlord-GZ2012D601TF_C1017.pdf, ComponentLink2Description="JLCPCB Part URL", ComponentLink2URL=https://jlcpcb.com/partdetail/C1017, ComponentLink3Description="LCSC Part URL", ComponentLink3URL=https://lcsc.com/product-detail/Ferrite-Beads_Sunlord-Sunlord-GZ2012D601TF_C1017.html, Manufacturer Part Number=GZ2012D601TF, RoHS=Yes, Supplier 1=LCSC, Supplier Part Number 1=C1017
FB2: "Ferrite, 470Ω@100MHz, ±25%, 200mΩ, 1A, SMD 0402", DC Resistance=200mΩ, Impedance @ Frequency=470Ω@100MHz, JLCPCB Basic Part=No, JLCPCB Part Number=C333978, Manufacturer="Murata Electronics", Package Size=0402, Rated Current=1A, Tolerance=±25%, Category="Ferrite Beads", ComponentLink1Description=Datasheet, ComponentLink1URL=https://wmsc.lcsc.com/wmsc/upload/file/pdf/v2/lcsc/1912111437_Murata-Electronics-BLM15PX471SN1D_C333978.pdf, ComponentLink2Description="JLCPCB Part URL", ComponentLink2URL=https://jlcpcb.com/partdetail/C333978, ComponentLink3Description="LCSC Part URL", ComponentLink3URL=https://lcsc.com/product-detail/Ferrite-Beads_Murata-Electronics-Murata-Electronics-BLM15PX471SN1D_C333978.html, Manufacturer Part Number=BLM15PX471SN1D, RoHS=Yes, Supplier 1=LCSC, Supplier Part Number 1=C333978
J1: "USB Connectors 24 Receptacle 1 8.94*7.3mm RoHS", Package=Package, Check_prices=https://www.snapeda.com/parts/TYPE-C-31-M-12/HRO+Electronics+Co.%252C+Ltd./view-part/?ref=eda, MF="HRO Electronics Co., Ltd.", MP=TYPE-C-31-M-12, SnapEDA_Link=https://www.snapeda.com/parts/TYPE-C-31-M-12/HRO+Electronics+Co.%252C+Ltd./view-part/?ref=snap
J2 J5 J8: "Header, 6 pins, 2.54mm", Package=None, Availability=Unavailable, MF="{'manufacturer': u'Wurth Electronics'}", MP=61300611121, Price=None
J3 J4: "Header, 3 pins, 2.54mm", Package=None, Availability=Unavailable, MP=61300311121, Price=None
J6 J7: "Header, 2x8 pins, 2.54mm", Package=None, Availability=Unavailable, MF="{'manufacturer': u'W\xfcrth Elektronik'}", MP=61301621121, Price=None
R1 R2 R3 R8: "Resistor, 1kΩ, ±1%, 62.5mW, 50V, ±100ppm/℃, -55℃~+155℃, SMD 0402", JLCPCB Basic Part=Yes, JLCPCB Part Number=C11702, Manufacturer=Uniroyal, Package Size=0402, Power Rating=62.5mW, Resistance=1kΩ, Temperature Coefficient=±100ppm/℃, Temperature Rating=-55℃~+155℃, Tolerance=±1%, Voltage Rating=50V, Category=Resistors, ComponentLink1Description=Datasheet, ComponentLink1URL=https://wmsc.lcsc.com/wmsc/upload/file/pdf/v2/lcsc/2206010216_UNI-ROYAL-Uniroyal-Elec-0402WGF1001TCE_C11702.pdf, ComponentLink2Description="JLCPCB Part URL", ComponentLink2URL=https://jlcpcb.com/partdetail/C11702, Manufacturer Part Number=0402WGF1001TCE, Supplier 1=LCSC, Supplier Part Number 1=C11702
R4 R5 R6 R7: "Resistor, 10kΩ, ±1%, 62.5mW, 50V, ±100ppm/℃, -55℃~+155℃, SMD 0402", JLCPCB Basic Part=Yes, JLCPCB Part Number=C25744, Manufacturer=Uniroyal, Package Size=0402, Power Rating=62.5mW, Resistance=10kΩ, Temperature Coefficient=±100ppm/℃, Temperature Rating=-55℃~+155℃, Tolerance=±1%, Voltage Rating=50V, Category=Resistors, ComponentLink1Description=Datasheet, ComponentLink1URL=https://wmsc.lcsc.com/wmsc/upload/file/pdf/v2/lcsc/2206010100_UNI-ROYAL-Uniroyal-Elec-0402WGF1002TCE_C25744.pdf, ComponentLink2Description="JLCPCB Part URL", ComponentLink2URL=https://jlcpcb.com/partdetail/C25744, Manufacturer Part Number=0402WGF1002TCE, Supplier 1=LCSC, Supplier Part Number 1=C25744
R9 R10: "Resistor, 5.1kΩ, ±1%, 62.5mW, 50V, ±100ppm/℃, -55℃~+155℃, SMD 0402", JLCPCB Basic Part=Yes, JLCPCB Part Number=C25905, Manufacturer=Uniroyal, Package Size=0402, Power Rating=62.5mW, Resistance=5.1kΩ, Temperature Coefficient=±100ppm/℃, Temperature Rating=-55℃~+155℃, Tolerance=±1%, Voltage Rating=50V, Category=Resistors, ComponentLink1Description=Datasheet, ComponentLink1URL=https://wmsc.lcsc.com/wmsc/upload/file/pdf/v2/lcsc/2206010045_UNI-ROYAL-Uniroyal-Elec-0402WGF5101TCE_C25905.pdf, ComponentLink2Description="JLCPCB Part URL", ComponentLink2URL=https://jlcpcb.com/partdetail/C25905, Manufacturer Part Number=0402WGF5101TCE, Supplier 1=LCSC, Supplier Part Number 1=C25905
R11 R12: "Resistor, 2.2kΩ, ±1%, 62.5mW, 50V, ±100ppm/℃, -55℃~+155℃, SMD 0402", JLCPCB Basic Part=Yes, JLCPCB Part Number=C25879, Manufacturer=Uniroyal, Package Size=0402, Power Rating=62.5mW, Resistance=2.2kΩ, Temperature Coefficient=±100ppm/℃, Temperature Rating=-55℃~+155℃, Tolerance=±1%, Voltage Rating=50V, Category=Resistors, ComponentLink1Description=Datasheet, ComponentLink1URL=https://wmsc.lcsc.com/wmsc/upload/file/pdf/v2/lcsc/2206010045_UNI-ROYAL-Uniroyal-Elec-0402WGF2201TCE_C25879.pdf, ComponentLink2Description="JLCPCB Part URL", ComponentLink2URL=https://jlcpcb.com/partdetail/C25879, Manufacturer Part Number=0402WGF2201TCE, Supplier 1=LCSC, Supplier Part Number 1=C25879
R13: "Resistor, 33Ω, ±1%, 62.5mW, 50V, ±100ppm/℃, -55℃~+155℃, SMD 0402", JLCPCB Basic Part=Yes, JLCPCB Part Number=C25105, Manufacturer=Uniroyal, Package Size=0402, Power Rating=62.5mW, Resistance=33Ω, Temperature Coefficient=±100ppm/℃, Temperature Rating=-55℃~+155℃, Tolerance=±1%, Voltage Rating=50V, Category=Resistors, ComponentLink1Description=Datasheet, ComponentLink1URL=https://wmsc.lcsc.com/wmsc/upload/file/pdf/v2/lcsc/2205311900_UNI-ROYAL-Uniroyal-Elec-0402WGF330JTCE_C25105.pdf, ComponentLink2Description="JLCPCB Part URL", ComponentLink2URL=https://jlcpcb.com/partdetail/C25105, Manufacturer Part Number=0402WGF330JTCE, Supplier 1=LCSC, Supplier Part Number 1=C25105
R14: "Resistor, 120Ω, ±1%, 62.5mW, 50V, ±100ppm/℃, -55℃~+155℃, SMD 0402", JLCPCB Basic Part=Yes, JLCPCB Part Number=C25079, Manufacturer=Uniroyal, Package Size=0402, Power Rating=62.5mW, Resistance=120Ω, Temperature Coefficient=±100ppm/℃, Temperature Rating=-55℃~+155℃, Tolerance=±1%, Voltage Rating=50V, Category=Resistors, ComponentLink1Description=Datasheet, ComponentLink1URL=https://wmsc.lcsc.com/wmsc/upload/file/pdf/v2/lcsc/2205311900_UNI-ROYAL-Uniroyal-Elec-0402WGF1200TCE_C25079.pdf, ComponentLink2Description="JLCPCB Part URL", ComponentLink2URL=https://jlcpcb.com/partdetail/C25079, Manufacturer Part Number=0402WGF1200TCE, Supplier 1=LCSC, Supplier Part Number 1=C25079
S1 S2 S3 S4: "Tactile Switch SPST-NO Top Actuated Through Hole", Package=None, Check_prices=https://www.snapeda.com/parts/TL1105AF160Q/E-Switch/view-part/?ref=eda, MF=E-Switch, MP=TL1105AF160Q, SnapEDA_Link=https://www.snapeda.com/parts/TL1105AF160Q/E-Switch/view-part/?ref=snap
U1: library part CMP-12105-000044-1, "MAINSTREAM ARM CORTEX-M4 CORE WI", Ambient Temperature Range High=+125°C, Ambient Temperature Range Low=-40°C, Frequency=170MHz, Manufacturer=STMicroelectronics, Max Junction Temp=+130°C, Max Supply Voltage=3.6V, Min Supply Voltage=1.62V, Package=LQFP64-5W, Temperature="-40°C to +125°C", Automotive=No, Category=IC, ComponentLink2Description=Datasheet, ComponentLink2URL=https://www.st.com/resource/en/datasheet/stm32g474rb.pdf, Core Architecture="ARM Cortex-M4", Data Bus Width=32bits, Device Class L1="Integrated Circuits (ICs)", Device Class L2="Embedded Processors and Controllers", Device Class L3=Microcontrollers, Digikey Description="MAINSTREAM ARM CORTEX-M4 CORE WI", Height=1.6mm, Interface=I2C,SPI,UART,USART,CAN,USB,LIN,IrDA,I2S,SMBus,Other, Lead Free=Yes, Manufacturer Part Number=STM32G474RBT3, Memory Size=512KBytes, Memory Type=FLASH, Number Of A/D Converters=1, Number Of Adc Channels=26, Number Of Cores=1, Number Of I2C Channels=4, Number Of I/Os=52, Number Of Pwm Channels=13, Number Of Spi Channels=3, Number Of Timers/Counters=14, Number Of Uart Channels=6, Number Of Usb Channels=1, Octopart=https://octopart.com/stm32g474rbt3-stmicroelectronics-102823552, Ram Size=128KBytes, RoHS=TRUE, Standoff Height=0.05mm, Temperature Range High=+125°C, Temperature Range Low=-40°C
U2: library part CMP-12756-000035-1, "IC REG LINEAR 3.3V 600MA SOT25", Case/Package=SOT-23-5, Dropout Voltage=250mV, Max Input Voltage=6V, Max Operating Temperature=85°C, Max Output Current=600mA, Min Input Voltage=2.5V, Min Operating Temperature=-40°C, Output Voltage=3.3V, Package Quantity=1, Quiescent Current=55uA, Accuracy=1.5%, Height=1.3mm, Lead Free="Lead Free", Length=3.1mm, Mount="Surface Mount", Number Of Outputs=1, Number of Pins=5, Number of Regulators=1, Output Current=600mA, Output Type=Fixed, Packaging="Tape and Reel", Polarity=Positive, Width=1.7mm
U3: "17V Clamp 5A (8/20Âµs) Ipp Tvs Diode Surface Mount SOT-23-6", Package="SOT-23-6 STMicroelectronics", Availability="In Stock", Check_prices=https://www.snapeda.com/parts/USBLC6-2SC6/STMicroelectronics/view-part/?ref=eda, MF=STMicroelectronics, MP=USBLC6-2SC6, Price=None, Purchase-URL=https://pricing.snapeda.com/search/part/USBLC6-2SC6/?ref=eda, SnapEDA_Link=https://www.snapeda.com/parts/USBLC6-2SC6/STMicroelectronics/view-part/?ref=snap
U4: library part CMP-1753-00002-2, "3-Axis Gyroscope, Accelerometer and a Digital Motion Processor(TM) (DMP), 2.375 to 3.46 V, -40 to 85 degC, 24-Pin QFN, RoHS, Tape and Reel", Manufacturer=InvenSense, Standard Package=5,000, Category=Sensors,Transducers, Datasheet URL=http://datasheet.octopart.com/MPU-6050-InvenSense-datasheet-14421344.pdf, Datasheet Version="Rev. 3.3, 05/2012", Dynamic Catalog=MPU-6000™Series, Family=Multifunction, Featured Product=MPU-60506-Axis,IntegratedI²CSolution, Manufacturer URL=http://www.invensense.com/, Online Catalog=MPU-6000™Series, Other Names="1428-1007-2 / MPU6050", Output Type=Digital, Sensor Type=MotionTracking, Unit PriceUSD=Digital
U5: library part CMP-04872-000213-1, "IC TRANSCEIVER 1/1 8SOIC", Case/Package=SOIC, Max Operating Temperature=125°C, Min Operating Temperature=-40°C, Data Rate=1Mbps, Lead Free="Lead Free", Mount="Surface Mount", Packaging="Tape and Reel", Receiver Hysteresis=120mV, RoHS Compliant=Yes
U6: "AT24C256C Series 256 Kb (32 K x 8) 1.7 V I2C-Compatible Serial EEPROM - SOIC-8", Package=None, Check_prices=https://www.snapeda.com/parts/AT24C256CSSHLT/Microchip+Technology/view-part/?ref=eda, MF="Microchip Technology", MP=AT24C256CSSHLT, SnapEDA_Link=https://www.snapeda.com/parts/AT24C256CSSHLT/Microchip+Technology/view-part/?ref=snap
VR1: "Trimmer, Cermet, Rest 10 Kilohms, PCB, 1 Turns, Pwr-Rtg 0.5 W, Tol 10%", Package="3362P-1 Bourns Inc.", Check_prices=https://www.snapeda.com/parts/3362P-1-103LF/Bourns/view-part/?ref=eda, MF=Bourns, MP=3362P-1-103LF, SnapEDA_Link=https://www.snapeda.com/parts/3362P-1-103LF/Bourns/view-part/?ref=snap
Y1: library part X322516MLB4SI, "-40℃~+85℃ 16MHz 50Ω 10pF Crystal Oscillator ±10ppm ±20ppm SMD3225-4P Crystals ROHS", Package=Package, Check_prices=https://www.snapeda.com/parts/X322516MLB4SI/YXC/view-part/?ref=eda, MF=YXC, MP=X322516MLB4SI, SnapEDA_Link=https://www.snapeda.com/parts/X322516MLB4SI/YXC/view-part/?ref=snap

## Free pads (board coordinates)
  round 6 hole 3.2: 3(55,65) 3(55,105) 3(130,65) 3(130,105)
  round 1.152 hole 1.152 unplated: TH(61,108) TH(126,62)

## Via types
v1: diameter 0.6, hole 0.3, Top Layer to Bottom Layer, 185 vias
v2: diameter 0.5, hole 0.2, Top Layer to Bottom Layer, 4 vias

## Nets (pads, with @x,y where several pads share a name; then routed paths per layer and width w, separated by ;. In a path a pad name is that pad's centre, name@x,y a point inside that pad or via, vN(x,y) a via of type N, cw(c..) or ccw(c..) an arc to the next point about the centre after c; other vN are vias at no path point)
+3.3V: C1.2 C2.2 C3.2 C4.2 C5.2 C6.2 C7.2 C16.2 C20.2 C22.2 C27.2 C28.2 C29.2 D4.2 FB1.1 J2.1 J5.2 J7.1 J8.2 R4.2 R5.2 R6.2 R11.2 R12.2 S4.3 U1.1 U1.16 U1.32 U1.48 U1.64 U2.5 U4.8 U4.13 U5.3 U6.8 | length 282.4
  Top Layer w0.25: 88.635,79.5 U1.48 ; 90,90 91,89 U1.32 ; U1.64 99,77.275 99.025,77.25 99.5,77.25 99.9,76.85 ; v1(99.75,87) U1.16 101,87.658 101.5,88.158 ; U1.1 102,79.5
  Top Layer w0.3: 81.25,98 U4.13 ; U4.8 84.775,98.75 84.775,99.274 85.53,100.029 85.53,100.33 C20.2 ; 101.5,88.158 101.5,88.554 101.866,88.92
  Top Layer w0.4: C6.2 87.62,78.72 87.855,78.72 88.635,79.5 ; C4.2 89.48,91.38 89.48,90.52 90,90 ; 99.9,76.85 100.2,76.55 C2.2 C1.2 ; 101.866,88.92 C3.2@102.75,88.92 ; 102,79.5 102.25,79.5 C5.2
  Top Layer w0.5: U5.3 65.315,93.385 C28.2 C27.2 67.031,93.231 68.231,93.231 v1(68.25,93.25) ; v1(69.161,89.128) 69.188,89.128 69.816,88.5 D4.2 74.35,86.85 C16.2@75.222,85.978 ; U2.5 72.673,85.978 C16.2@75.222,85.978 ; v1(74,80) v1(74.75,80.75) 77.05,83.05 77.05,85.95 ; U6.8 75.222,99.427 77.477,99.427 C29.2 79.523,99.45 79.973,99 v1(80,99) 80,98.973 80.5,98.473 C22.2 ; 78.761,85 78.587,84.827 78.173,84.827 77.05,85.95 ; v1(80.25,79.75) 80.269,79.731 80.269,79.231 80.9,78.6 84.2,78.6 ; 80.261,83.5 78.756,85.006 v1(80.75,87) 81.516,87.766 81.516,87.813 v1(81.535,87.833) ; v1(80.275,81.75) 80.275,83.5 R12.2 R11.2 ; 80.57,97.777 80.793,98 81.25,98 ; v1(83.75,90) 83.769,90.019 84.492,90.019 84.723,90.25 v1(84.75,90.25) 86,91.5 v1(88,91.5) C4.2 89.6,93.315 90.075,93.79 FB1.1 90.075,95.975 C7.2 ; C20.2 v1(86.75,100.5) ; v1(86.209,75.455) 84.2,77.464 84.2,78.6 ; v1(86.945,69.441) 86.953,69.433 86.953,63.507 J8.2 ; C6.2 84.2,78.6 ; C1.2 100.77,73.43 101.766,73.43 102.376,72.82 103.403,72.82 v1(103.422,72.801) 104.322,73.701 104.322,77.734 103.376,78.68 103.07,78.68 C5.2 ; C3.2 102.82,89.22 102.976,89.22 v1@103.75,89.994 ; v1(108.772,91.546) 108.792,91.565 108.792,91.757 109.784,92.75 110.296,92.75 110.313,92.767 119.299,92.767 121,91.066 S4.3 121.066,91 124.55,87.516 124.55,87.066 ; R4.2 124.6,86.8 124.6,87.066 124.984,87.45 126.917,87.45 127.21,87.157 127.21,79.923 126.174,78.887 125.139,78.887 124.6,78.348 124.6,77.8 R5.2@124.562,77.762 ; C16.2@75.222,85.978 C16.2 77.05,85.95
  Bottom Layer w0.3: 98.5,87 v1(99.75,87)
  Bottom Layer w0.4: 97.75,87 98.5,87
  Bottom Layer w0.5: J2.1 64.26,68.01 74,77.75 v1(74,80) v1(74.75,80.75) ; v1(69.161,89.128) 69.161,92.339 v1(68.25,93.25) 66.519,94.981 66.519,100.719 J5.2 ; v1(80.25,79.75) 80.275,79.775 v1(80.275,81.75) ; v1(80.75,87) 80,87.75 v1(80,99) 80.019,99.019 80.019,99.769 80.75,100.5 v1(86.75,100.5) ; v1(81.535,87.833) v1@83.726,90.024 ; v1@84.731,90.231 v1(84.75,90.25) ; v1(86.945,69.441) 86.945,73.045 86.209,73.781 v1(86.209,75.455) 90.893,70.771 102.475,70.771 103.422,71.718 v1(103.422,72.801) ; v1(88,91.5) 88,89.607 90.607,87 97.75,87 ; v1@103.75,90.001 106.449,92.7 107.636,92.7 108.772,91.563 v1(108.772,91.546) ; S4.3@121.028,91 122.04,89.988 J7.1
  other v1: 103.75,90
+3.3VA: C8.2 C9.2 C10.2 C11.2 FB1.2 J6.1 J6.15 U1.28 U1.29 VR1.1 | length 72.9
  Top Layer w0.25: U1.29 93,90 ; U1.28 93.5,90.25
  Top Layer w0.4: C9.2 93,91.45 93,90 ; 93.5,90.25 93.5,90.45 C11.2 C10.2@94.3,92.5
  Top Layer w0.5: FB1.2@91.925,93.79 92.18,93.535 92.39,93.535 92.95,92.975 C9.2 ; C8.2 91.925,95.975 FB1.2 93.05,94 93.675,93.375 ; v1(94.25,95) 93.675,94.425 93.675,93.375 ; C10.2 93.675,93.375
  Bottom Layer w0.5: v1(94.25,95) 94.84,95 J6.15 105.335,105.495 120.665,105.495 J6.1 120.575,102.955 120.575,99.207 119.14,97.772 119.14,85.1 VR1.1
+5V: C15.2 C18.2 FB2.2 J7.15 U2.1 U2.3 | length 51.4
  Top Layer w0.5: v1(70.25,77.5) 70.256,77.5 71.18,76.576 v1(71.185,76.576) 71.185,76.57 77.5,70.256 v1(77.5,70.25) 77.75,70 v1(78.75,70) ; v1(70.25,79.5) 70.236,79.514 70.236,80.493 v1(70.222,80.507) 70.236,80.521 70.236,84.086 U2.3 70.827,84.1 71.069,84.342 71.089,84.342 71.504,84.757 71.504,85.343 70.905,85.942 70.308,85.942 U2.1
  Bottom Layer w0.5: v1@70.25,80.521 v1(70.25,79.5) 70.25,77.506 v1@71.18,76.576 ; v1(78.75,70) 81.68,67.07 103.229,67.07 J7.15
+VBUS: C17.2 F1.2 FB2.1 U3.5 | length 11.7
  Top Layer w0.5: F1.2 58.85,85.643 59.35,85.143 60.057,85.143 63.1,82.1 63.1,79.1 63.655,78.545 64.21,78.545 U3.5 ; C17.2 64.3,86.25 FB2.1
BTN0: C25.2 R4.1 S1.3 U1.36 | length 49.8
  Top Layer w0.25: U1.36 90.905,85.5 91.106,85.701 v1(91.201,85.701) ; v1(120.75,83.25) 122.5,85 S1.3
  Top Layer w0.3: C25.2 85.45,85.5 U1.36
  Top Layer w0.5: S1.3 125,85.273 125.45,85.723 R4.1
  Bottom Layer w0.25: v1(91.201,85.701) 95.128,81.774 95.128,81.059 98.988,77.199 102.786,77.199 103.587,78 115.5,78 v1(120.75,83.25)
BTN1: C26.2 R5.1 S2.3 U1.37 | length 47.1
  Top Layer w0.25: U1.37 90.828,85 91.174,84.654 91.174,84.075 v1(91.241,84.008) ; v1(120.5,75.5) 120.567,75.567 124.451,75.567 S2.3@124.817,75.933
  Top Layer w0.3: C26.2 U1.37
  Top Layer w0.5: S2.3 125,76.023 125.45,76.473 R5.1
  Bottom Layer w0.25: v1(91.241,84.008) 91.289,83.96 92.294,83.96 94.728,81.527 94.728,80.893 99.21,76.411 119.589,76.411 v1(120.5,75.5)
CAN_N: J4.2 R14.1 U5.6 | length 6.4
  Top Layer w0.25: J4.2 53.1,93.56 53.558,93.103 ; 53.558,93.101 53.96,92.699 54.392,92.699 54.674,92.98 55.48,92.98 R14.1 56.093,93.007 57.03,93.007 57.408,93.385 U5.6
CAN_P: J4.1 R14.2 U5.7 | length 5.8
  Top Layer w0.25: J4.1 53.889,92.249 54.579,92.249 54.86,92.53 55.67,92.53 R14.2 55.957,92.557 56.991,92.557 57.433,92.115 U5.7
EXT_I2C_INT: J5.5 U1.26 | length 29.7
  Top Layer w0.25: v1(94.5,87.75) U1.26
  Bottom Layer w0.25: J5.5 78.52,105.1 83.4,105.1 89.396,99.104 89.396,92.791 94.437,87.75 v1(94.5,87.75)
FDCAN2_RX: U1.34 U5.4 | length 30
  Top Layer w0.3: U5.4 67.845,94.655 72.25,90.25 82.636,90.25 86.386,86.5 U1.34
FDCAN2_TX: U1.35 U5.1 | length 28.6
  Top Layer w0.3: U5.1 68.655,90.845 70.078,89.422 82.828,89.422 86.25,86 U1.35
GND: C1.1 C2.1 C3.1 C4.1 C5.1 C6.1 C7.1 C8.1 C9.1 C10.1 C11.1 C12.1 C13.1 C14.1 C15.1 C16.1 C17.1 C18.1 C19.1 C20.1 C21.1 C22.1 C23.1 C24.1 C25.1 C26.1 C27.1 C28.1 C29.1 J1.A1_B12 J1.B1_A12 J1.S1 J1.S2 J1.S3 J1.S4 J2.3 J3.3 J4.3 J5.1 J6.2 J6.14 J6.16 J7.2 J7.14 J7.16 J8.1 pad.3 R1.1 R2.1 R3.1 R7.1 R8.1 R9.1 R10.1 S1.1 S2.1 S3.1 U1.15 U1.27 U1.31 U1.47 U1.63 U2.2 U3.2 U4.1 U4.9 U4.11 U4.18 U4.25 U5.2 U5.5 U5.8 U6.1 U6.2 U6.3 U6.4 U6.7 VR1.3 Y1.2 Y1.4 | length 94.1
  Top Layer w0.2: 98.508,76.534 U1.63@98.508,77.492
  Top Layer w0.25: 88.5,80.05 88.55,80 U1.47 ; U1.31 U1.31@92,89.275 ; U1.27 94,90 94.25,90.25 ; U1.15 101.025,86.525 101.612,86.525 101.662,86.575 101.714,86.575 101.875,86.736 101.875,87.375 102,87.5
  Top Layer w0.3: 81.3,95.5 U4.18 ; C19.1 82.72,100.33 82.72,100.03 83.225,99.525 83.225,98.75 U4.11 ; U4.9 84.25,99.95 C20.1 ; U4.1 86.025,95.475 86.525,95.475 86.918,95.082 86.918,94.807 v1(86.975,94.75) ; 94.25,90.25 94.5,90.25 95.03,90.78 95.03,91.08 C11.1 ; 98.508,76.534 98.792,76.25 99.074,76.25 99.25,76.074 99.25,75.55 C2.1 ; 102,87.5 102.765,88.265 103.398,88.265 103.642,88.509 103.642,88.702 v1(103.699,88.759)
  Top Layer w0.4: v1(55.866,90.836) 55.87,90.841 58.132,90.841 U5.8 ; v1(55.896,94.684) 55.91,94.669 58.122,94.669 U5.5 ; R8.1 76.763,87.537 77.875,87.537 v1(77.888,87.524) ; v1(82.75,85) C26.1 ; v1(82.75,86.25) C25.1 ; v1(86.5,79.5) C6.1 88.05,80.05 88.5,80.05 ; v1(90.5,92.5) C4.1 90.5,90.5 90.75,90.25 91.5,90.25 92,89.75 U1.31@92,89.4 ; v1(92.034,92.514) 92.042,92.506 92.042,91.508 C9.1 ; C11.1 C10.1@95.2,92.5 ; C1.1@99.267,73.967 C1.1 C2.1 ; R2.1 v1(117.5,73) ; R1.1 v1(117.5,75) ; R3.1 v1(117.5,71) ; R7.1 v1(128,93.5)
  Top Layer w0.5: J1.B1_A12 57.52,74.3 58.051,73.769 58.481,73.769 v1(58.5,73.75) ; J1.A1_B12 57.52,80.7 58.301,81.481 58.731,81.481 v1(58.75,81.5) ; v1(60.25,71.75) R9.1 ; R10.1 61.423,82.2 61.473,82.25 v1(61.5,82.25) ; U3.2 61.79,78.455 62.545,78.455 v1(63,78) ; U5.2 65.315,92.115 C28.1 C27.1 67.07,92.23 67.675,92.23 68.087,91.818 v1(68.114,91.818) ; v1(64,84) C17.1 C18.1 ; v1(65.5,84) C18.1 ; v1(67.25,84) C15.1 ; v1(67.921,95.574) 67.932,95.584 69.789,95.584 U6.4 ; v1(67.921,98.15) 67.929,98.142 69.793,98.142 U6.2 ; v1(67.921,99.405) U6.1 ; v1(67.926,96.826) 67.953,96.826 67.988,96.861 69.796,96.861 U6.3 ; U2.2 C15.1 ; U6.7 77.085,98.135 C29.1 v1(78.675,98.55) ; v1(75.25,84) C16.1 ; v1(79.25,97) 79.88,96.37 80.43,96.37 C22.1 80.57,96.23 80.57,95.723 80.793,95.5 81.3,95.5 ; v1(80.75,94.25) 80.75,93.725 C21.1 ; C19.1 82.556,100.506 82.553,100.51 82.553,101.633 v1(82.556,101.637) ; C20.1 84.802,100.502 84.802,101.609 v1(84.805,101.611) ; v1(89.991,98.055) 89.995,98.051 89.995,96.955 C7.1 ; C8.1 92.007,96.957 92.007,98.045 v1(92.013,98.052) ; C10.1 95.2,93.859 95.233,93.892 v1(95.233,93.919) ; v1(97.747,72.647) 97.748,72.649 97.748,74.048 C24.1 ; v1(99.222,72.936) 99.241,72.955 99.241,73.941 C1.1@99.267,73.967 ; C5.1 103.481,77.369 103.481,77.019 v1(103.5,77) ; v1(103.55,82.3) C13.1 ; C14.1 105,79.55 v1(105,79) ; C12.1 v1(106.5,84.5) ; C23.1 v1(106.5,86) ; Y1.2 106.731,79.819 106.731,78.594 v1(106.75,78.575) ; Y1.4 108.36,82.11 109.724,82.11 v1(109.735,82.121) ; C18.1 C15.1
  other v1: 60.098,63.965 80.098,63.965 100.098,63.965 58.098,67.965 62.098,67.965 66.098,67.965 70.098,67.965 118.098,67.965 52.098,71.965 56.098,71.965 64.098,71.965 72.098,71.965 80.098,71.965 88.098,71.965 108.098,71.965 116.098,71.965 54.098,75.965 62.098,75.965 66.098,75.965 70.098,75.965 74.098,75.965 78.098,75.965 82.098,75.965 130.098,75.965 52.098,79.965 68.098,79.965 72.098,79.965 76.098,79.965 112.098,79.965 116.098,79.965 120.098,79.965 74.098,83.965 78.098,83.965 98.098,83.965 110.098,83.965 126.098,83.965 130.098,83.965 52.098,87.965 56.098,87.965 88.098,87.965 100.098,87.965 108.098,87.965 120.098,87.965 74.098,91.965 114.098,91.965 118.098,91.965 122.098,91.965 130.098,91.965 56.098,95.965 60.098,95.965 64.098,95.965 72.098,95.965 88.098,95.965 100.098,95.965 120.098,95.965 124.098,95.965 128.098,95.965 58.098,99.965 62.098,99.965 90.098,99.965 94.098,99.965 98.098,99.965 102.098,99.965 122.098,99.965 126.098,99.965 130.098,99.965 60.098,103.965 64.098,103.965 88.098,103.965 100.098,103.965 124.098,103.965
  other v2: 83.45,96.2 84.55,96.2 83.45,97.3 84.55,97.3
I2C3_SCL: J5.4 R12.1 U1.40 U4.23 U6.6 | length 44.1